# Altium PCB ScreenerPhotodiodeSense.PcbDoc
Units mm, origin at the board's own origin, x right, y up, seen from the top; angles counter-clockwise.
Board outline 54.9 x 37.97 mm, 2 copper layers (Top Layer, Bottom Layer); 24 components, 14 nets, 69 pads, 236 vias.
Unrouted connection lines stored in the file: 16.
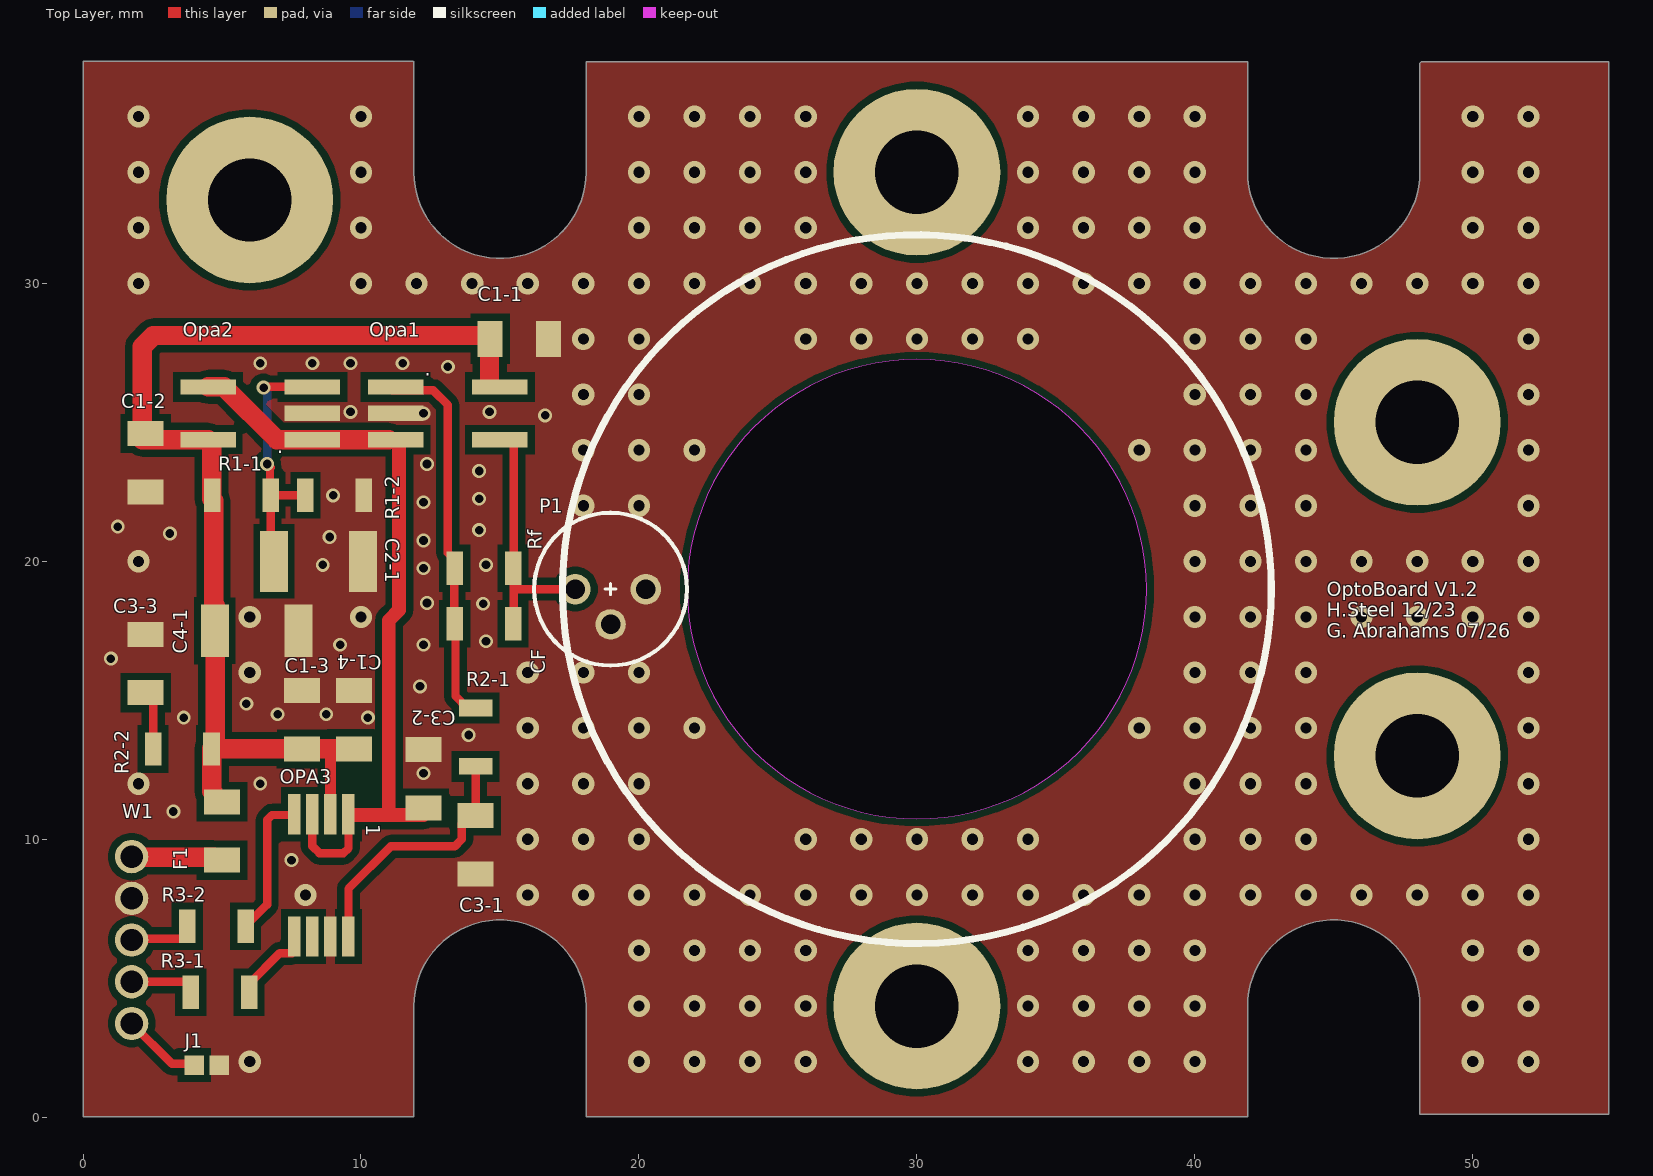
[diagram p0: Top Layer view]
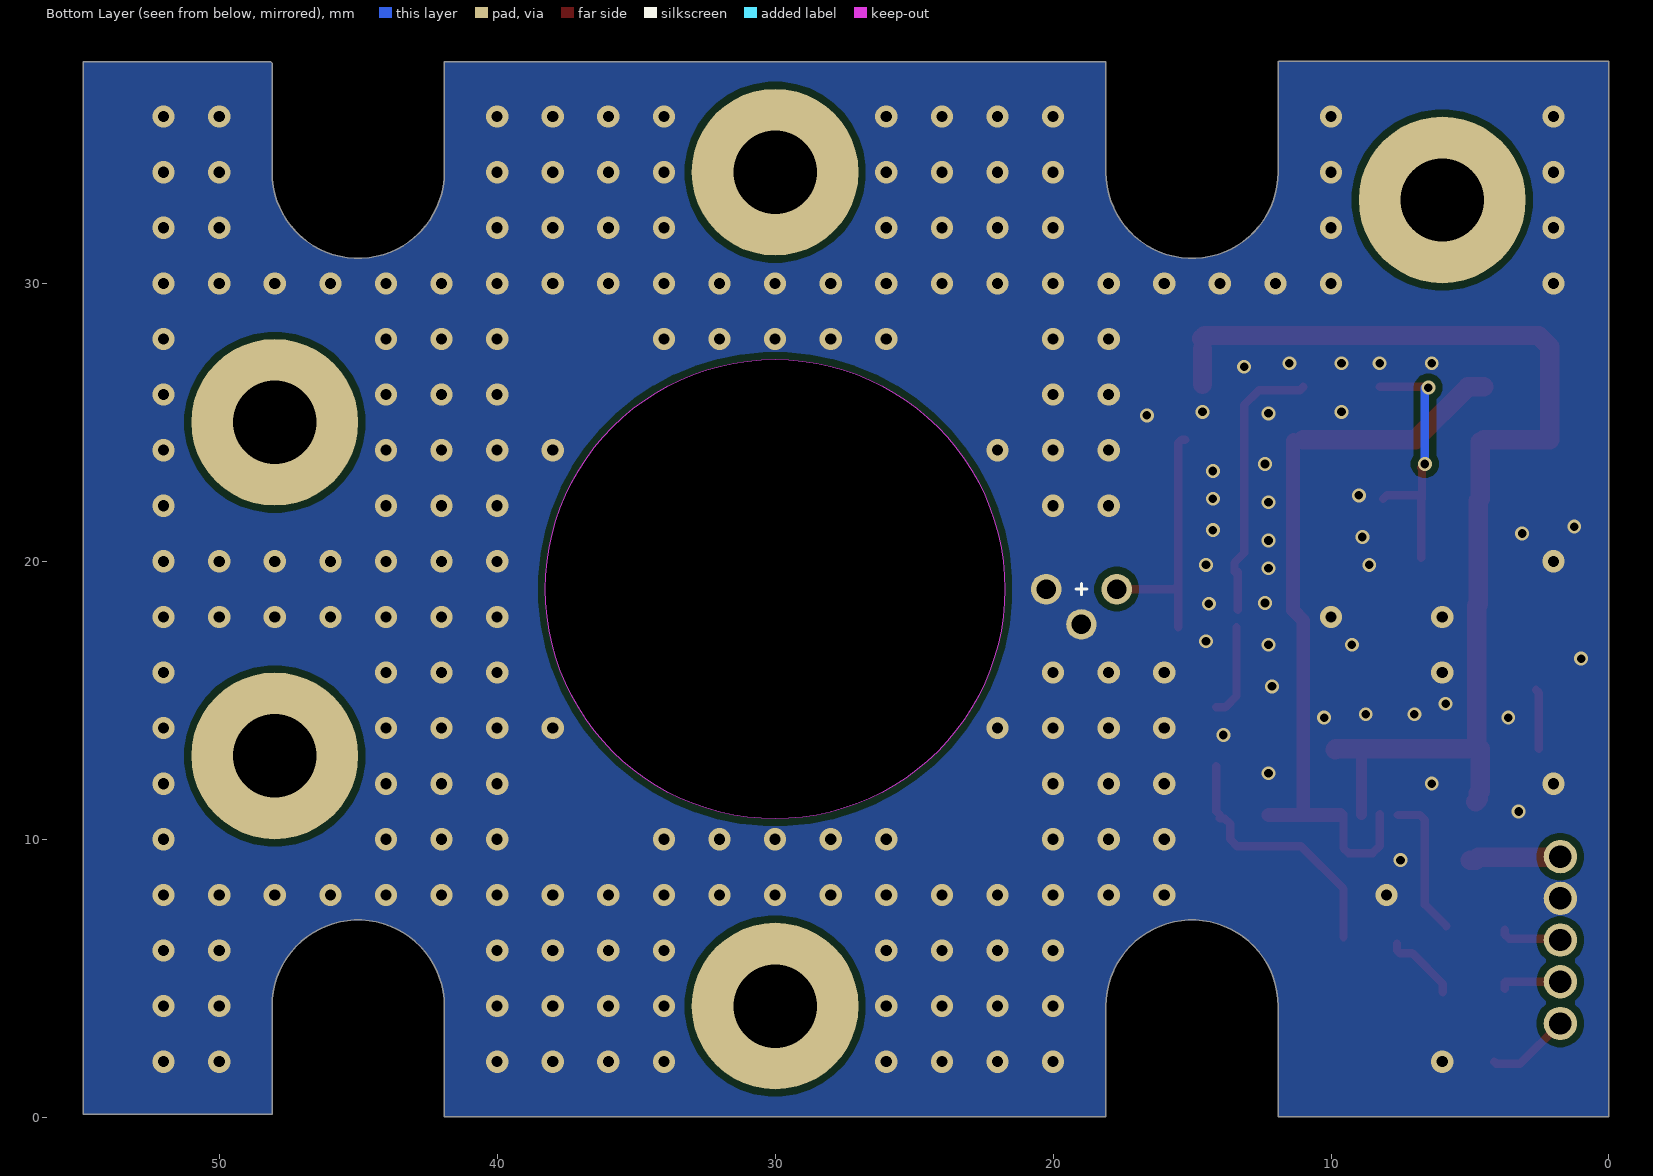
[diagram p1: Bottom Layer view, seen from below]

## Layer stack, top to bottom
Top Solder: solder mask 0.0102, Solder Resist, Dk 3.5
Top Layer: signal copper 0.0356
Dielectric 1: dielectric 0.32, FR-4, Dk 4.8
Bottom Layer: signal copper 0.0356
Bottom Solder: solder mask 0.0102, Solder Resist, Dk 3.5

## Board outline
0,0.025 11.9,0.025 11.9,4 cw(c15,4) 18.1,4 18.1,0.025 41.9,0.025 41.9,4 cw(c45,4) 48.1,4 48.1,0.1 54.9,0.1 54.9,37.975 48.15,37.975 48.1,37.925 48.1,34 cw(c45,34) 41.9,34 41.9,37.975 18.1,37.975 18.1,34 cw(c15,34) 11.9,34 11.9,37.975 11.875,38 0,38
cut-out: 21.735,19 ccw(c30,19) 30,10.735 ccw(c30,19) 38.265,19 ccw(c30,19) 30,27.265 ccw(c30,19)

## Design rules (kind name [scope] priority, off if disabled: settings)
Clearance [All] p1: gap=0.25 ignorepadtopadclearanceinfootprint=TRUE except(0: Arc-Text Track-Text SMDPad-Text THPad-Text Via-Text Fill-Text Poly-Text Region-Text Text-Text Text-Hole; 0.2: SMDPad-SMDPad THPad-THPad)
HoleSize [All] p1: absolutevalues=TRUE maxlimit=99 minlimit=0.025 maxpercent=80.000 minpercent=20.000
MinimumSolderMaskSliver [All] p1: minsoldermaskwidth=0
PlaneConnect [All] p1: planeconnectstyle=Direct reliefexpansion=0.508 reliefentries=4 reliefconductorwidth=0.254 reliefairgap=0.254
PolygonConnect [All] p1: connectstyle=Direct reliefconductorwidth=0.5 reliefentries=4 polygonreliefangle="90 Angle" airgapwidth=0.254
RoutingVias [All] p1: holewidth=0.45 width=0.8 viastyle="Through Hole" minholewidth=0.3 minwidth=0.5 maxholewidth=2 maxwidth=10
SolderMaskExpansion [All] p1: expansion=0.102 istentingtop=FALSE
Width [All] p1: maxlimit=50 minlimit=0.254 preferedwidth=0.254 minimp=50.000000 maximp=50.000000 favimp=50.000000
27 further rules are at their usual default settings.

## Components (designator, comment, footprint, x,y, rotation, side; value= is the part's Value field where it differs from the comment)
C1-1 "0.1uF" 0805 14.65,28 r0 top
C1-2 "0.1uF" 0805 2.25,22.5 r90 top
C1-3 "0.1uF" 0805 7.875,13.25 r90 top
C1-4 "0.1uF" 0805 9.75,13.25 r90 top
C2-1 "0.1uF NP0" 1206_Wide 6.875,20 r0 top
C3-1 "NC" 0805 14.125,8.75 r90 top
C3-2 "NC" 0805 12.25,13.225 r270 top
C3-3 "NC" 0805 2.25,17.375 r270 top
C4-1 "NC" 1206 4.75,17.5 r0 top
CF "NC" 0805_Compact 15.475,17.75 r180 top
F1 "FerriteBead1" 0805 5,9.25 r90 top
J1 "Jumper2" Jumper2 4,1.875 r0 top
Opa1 "Amplifier_TIA" SOT23-5 11.25,26.275 r0 top
Opa2 "Amplifier_Precision2" SOT23-5 8.25,24.375 r180 top
OPA3 "AD8476" 8-MSOP 9.55,10.9 r270 top
P1 "PhotodiodeS5971" TO-18 18.98,19 r180 top
R1-1 "10k" 0805_Compact 6.75,22.375 r180 top
R1-2 "10k" 0805_Compact 10.1,22.375 r180 top
R2-1 "0" 0805_Compact 14.125,12.625 r90 top
R2-2 "0" 0805_Compact 4.625,13.25 r180 top
R3-1 "49.9" 0805_Compact 3.875,4.5 r0 top
R3-2 "49.9" 0805_Compact 3.75,6.875 r0 top
Rf "Various" 0805_Compact 15.475,19.75 r180 top
W1 "PhotodiodeWires" PhotodiodeWires 1.75,9.375 r0 top

## Footprints (in the part's own frame and the unit in brackets; to place one, negate y for a bottom-side part, rotate by r counter-clockwise, add the part's x,y. Pads: shape width x height; smd on the part's side, far side on the other; paste and mask are expansions set on the pad)
8-MSOP [mm]
  rect 1.45x0.45 smd: 1(0,0) 2(0,-0.65) 3(0,-1.3) 4(0,-1.95) 5(4.4,-1.95) 6(4.4,-1.3) 7(4.4,-0.65) 8(4.4,0)
0805 [mm]
  rect 0.9x1.3 smd: 1(2.1,0) 2(0,0)
0805_Compact [mm]
  rect 0.6x1.2 smd: 1(2.1,0) 2(0,0)
1206 [mm]
  rect 1x1.9 smd mask+0.05: 1(0,0) 2(3,0)
1206_Wide [mm]
  rect 1x2.2 smd mask+0.05: 1(0,0) 2(3.2,0)
Jumper2 [mm]
  rect 0.7x0.7 smd mask+0.05: 1(0,0) 2(0.9,0)
PhotodiodeWires [mm]
  round 1.2 hole 0.8 mask+0.05: 1(0,0) 2(0,-1.5) 3(0,-3) 4(0,-4.5) 5(0,-6)
SOT23-5 [mm]
  rect 2x0.55 smd mask+0.051: 1(0,0) 2(0,-0.95) 3(0,-1.9) 4(3.75,-1.9) 5(3.75,0)
TO-18 [mm]
  round 1.1 hole 0.7 mask+0.05: 1(1.27,0) 2(0,1.27) 3(-1.27,0)
  silkscreen extent -2.75,-2.75 2.75,2.75

## Part data
C1-1 C1-2 C1-3 C1-4 C3-3 C4-1 CF: library part Capacitor1
  C3-3 C4-1: Digikey P/N=490-14531-1-ND
  CF: Digikey P/N="311-4124-1-ND, 311-4134-1-ND, 311-4130-1-ND, 13-CC0805BRNPO9BN5R6CT-ND"
C2-1 C3-1 C3-2: library part "Cap 0805", "Capacitor"
  C2-1: Digikey P/N=445-6984-1-ND
R1-1 R1-2 R2-1 R2-2 R3-1 R3-2 Rf: library part Res1
  R1-1 R1-2 R2-1: Digikey P/N=TNPU10.0KBBCT-ND
  R2-2 R3-1 R3-2: Digikey P/N=738-RNCF0805TKY49R9CT-ND
  Rf: Digikey P/N="541-TNPU08052K49BZEN00CT-ND, 541-4671-1-ND, 2019-RN73R2ATTD6192B05CT-ND, 541-TNPU080547K5BZEN00CT-ND, 2019-RN73R2ATTD3242A05CT-ND, 2019-RN73R2ATTD2292B05CT-ND,  2019-RN73R2ATTD1562B05CT-ND, 541-TNPU080515K0BZEN00CT-ND, 541-TNPU08057K50BZEN00CT-ND, 541-4456-1-ND, 541-TNPU08055K10BZEN00CT-ND,  541-4454-1-ND"
F1: Digikey P/N=445-MPZ2012S331ATD25CT-ND
Opa1: Digikey P/N=296-OPA328DBVRCT-ND
Opa2: Digikey P/N=296-OPA388QDBVRQ1CT-ND
OPA3: Digikey P/N=505-AD8476BRMZ-ND
P1: Digikey P/N=124-7158

## Free pads (board coordinates)
  round 6 hole 3 unplated paste+0: 2(6,33) 2(30,4) 2(30,34) 2(48,13) 2(48,25)

## Via types
v1: diameter 0.8, hole 0.4, Top Layer to Bottom Layer, tented both sides, 195 vias
v2: diameter 0.5, hole 0.31, Top Layer to Bottom Layer, tented both sides, 41 vias

## Nets (pads, with @x,y where several pads share a name; then routed paths per layer and width w, separated by ;. In a path a pad name is that pad's centre, name@x,y a point inside that pad or via, vN(x,y) a via of type N, cw(c..) or ccw(c..) an arc to the next point about the centre after c; other vN are vias at no path point)
2V5: C3-2.1 Opa1.3 Opa2.1 Opa2.4 OPA3.1 OPA3.3 | length 27.4
  Top Layer w0.3: OPA3.3 8.25,9.75 8.5,9.5 9.374,9.5 9.55,9.676 OPA3.1
  Top Layer w0.5: OPA3.1@9.675,10.875 11,10.875 ; Opa1.3@11.35,24.375 11.375,24.35 11.375,18.25 11,17.875 11,10.875 ; C3-2.1@12.25,10.875 11,10.875
  Top Layer w0.7: Opa2.4 5.075,26.275 6.975,24.375 Opa1.3@11,24.375
5V: C1-1.2 C1-2.1 C1-3.2 C1-4.2 C4-1.1 F1.1 Opa1.5 Opa2.5 OPA3.2 R1-1.1 R2-2.2 | length 40.3
  Top Layer w0.4: OPA3.2 8.9,13.2 ; C1-4.2@9.85,13.225 C1-4.2@9.875,13.25
  Top Layer w0.7: C1-2.1@2.125,24.375 Opa2.5 4.575,24.3 4.625,24.3 4.625,22.25 4.7,22.175 4.7,18.45 4.75,18.4 4.75,13.25 C1-3.2 9.825,13.25 C1-4.2@9.85,13.225 ; C1-2.1@2.125,24.5 2.125,27.715 2.535,28.125 14.55,28.125 14.65,28.025 C1-1.2 ; R2-2.2 4.625,11.725 4.7,11.65 4.7,11.45 F1.1@4.8,11.35 ; Opa1.5@14.625,26.375 C1-1.2@14.625,27.643
GND: C1-1.1 C1-2.2 C1-3.1 C1-4.1 C2-1.2 C3-1.2 C3-2.2 C3-3.2 C4-1.2 J1.2 Opa1.2 Opa2.2 OPA3.7 P1.2 P1.3 R1-2.2 W1.2
  other v1: 6,2 20,2 22,2 24,2 26,2 34,2 36,2 38,2 40,2 50,2 52,2 20,4 22,4 24,4 26,4 34,4 36,4 38,4 40,4 50,4 52,4 20,6 22,6 24,6 26,6 34,6 36,6 38,6 40,6 50,6 52,6 8,8 16,8 18,8 20,8 22,8 24,8 26,8 28,8 30,8 32,8 34,8 36,8 38,8 40,8 42,8 44,8 46,8 48,8 50,8 52,8 16,10 18,10 20,10 26,10 28,10 30,10 32,10 34,10 40,10 42,10 44,10 52,10 2,12 16,12 18,12 20,12 40,12 42,12 44,12 52,12 16,14 18,14 20,14 22,14 38,14 40,14 42,14 44,14 52,14 6,16 16,16 18,16 20,16 40,16 42,16 44,16 52,16 6,18 10,18 40,18 42,18 44,18 46,18 48,18 50,18 52,18 2,20 40,20 42,20 44,20 46,20 48,20 50,20 52,20 18,22 20,22 40,22 42,22 44,22 52,22 18,24 20,24 22,24 38,24 40,24 42,24 44,24 52,24 18,26 20,26 40,26 42,26 44,26 52,26 18,28 20,28 26,28 28,28 30,28 32,28 34,28 40,28 42,28 44,28 52,28 2,30 10,30 12,30 14,30 16,30 18,30 20,30 22,30 24,30 26,30 28,30 30,30 32,30 34,30 36,30 38,30 40,30 42,30 44,30 46,30 48,30 50,30 52,30 2,32 10,32 20,32 22,32 24,32 26,32 34,32 36,32 38,32 40,32 50,32 52,32 2,34 10,34 20,34 22,34 24,34 26,34 34,34 36,34 38,34 40,34 50,34 52,34 2,36 10,36 20,36 22,36 24,36 26,36 34,36 36,36 38,36 40,36 50,36 52,36
  other v2: 7.5,9.25 3.25,11 6.375,12 12.25,12.375 13.875,13.75 3.625,14.375 10.25,14.375 7,14.5 8.75,14.5 5.875,14.875 12.125,15.5 1,16.5 9.25,17 12.25,17 14.5,17.125 14.395,18.475 12.375,18.5 12.25,19.75 8.625,19.875 14.5,19.875 12.25,20.75 8.875,20.875 3.125,21 14.25,21.125 1.25,21.25 12.25,22.125 14.25,22.25 9,22.375 14.25,23.25 12.375,23.5 16.625,25.25 12.25,25.325 9.625,25.375 14.625,25.375 13.125,27 6.375,27.125 8.25,27.125 9.625,27.125 11.5,27.125
NetC2-1_1: C2-1.1 Opa2.3 R1-1.2 R1-2.1 | length 9.3
  Top Layer w0.3: v2(6.5,26.25) 6.525,26.275 Opa2.3 ; R1-1.2@6.725,22.25 6.725,23.35 v2@6.75,23.375 ; C2-1.1@6.75,20.125 R1-1.2 R1-2.1 R1-2.1@8.125,22.25
  Bottom Layer w0.3: v2(6.625,23.5) v2@6.625,26.25
NetC3-1_1: C3-1.1 OPA3.8 R2-1.2 | length 9.4
  Top Layer w0.3: OPA3.8@9.55,6.475 9.55,8.223 11.077,9.75 13.375,9.75 13.625,10 13.625,10.55 13.825,10.75 C3-1.1@14,10.75 ; C3-1.1@14,10.875 14.125,11 R2-1.2
NetC3-3_1: C3-3.1 R2-2.1 | length 2.2
  Top Layer w0.3: R2-2.1 2.525,15.275 C3-3.1@2.625,15.375
NetCF_1: CF.1 Opa1.1 R2-1.1 Rf.1 | length 13.3
  Top Layer w0.3: Opa1.1@11,26.275 11.125,26.15 12.6,26.15 13.125,25.625 13.125,20.3 13.475,19.95 Rf.1@13.475,19.625 ; CF.1@13.35,18.25 Rf.1@13.35,19.625 ; CF.1@13.4,17.625 13.4,15.15 13.8,14.75 R2-1.1@14.125,14.75
NetCF_2: CF.2 Opa1.4 P1.1 Rf.2 | length 9.5
  Top Layer w0.3: Opa1.4@15.25,24.375 15.375,24.375 15.5,24.25 15.5,19.75 15.5,19.125 ; CF.2@15.5,17.625 15.5,19 15.5,19.125 ; P1.1@17.855,18.875 P1.1@17.875,18.875 ; P1.1@17.98,19 17.855,19 15.625,19 15.5,19.125
NetF1_2: F1.2 W1.1 | length 3.3
  Top Layer w0.7: W1.1 1.775,9.35 4.7,9.35 4.8,9.25 F1.2
NetJ1_1: J1.1 W1.5 | length 3
  Top Layer w0.3: W1.5 3.2,1.925 4.05,1.925 J1.1@4.125,2
NetOpa3_4: OPA3.4 R3-2.1 | length 5.2
  Top Layer w0.3: R3-2.1 6.625,7.65 6.625,10.699 6.801,10.875 OPA3.4@7.6,10.875
NetOpa3_5: OPA3.5 R3-1.1 | length 2.7
  Top Layer w0.3: R3-1.1 5.975,4.8 7.075,5.9 7.525,5.9 7.625,6 OPA3.5@7.625,6.25
V1: R3-2.2 W1.3 | length 2.3
  Top Layer w0.3: W1.3 1.8,6.425 3.6,6.425 3.75,6.575 R3-2.2@3.75,6.75
V2: R3-1.2 W1.4 | length 2.2
  Top Layer w0.3: W1.4 3.725,4.875 3.75,4.85 R3-1.2@3.75,4.625
pads on no net: OPA3.6

## Polygon pours and split planes (outlines as drawn)
GND on Bottom Layer "NONET_L-01_P-001" (solid, remove dead copper, pour order 3): 11.9,0.025 11.9,4 cw(c15,4) 18.1,4 18.1,0.025 41.9,0.025 41.9,4 cw(c45,4) 48.1,4 48.1,0.1 54.9,0.1 54.9,37.975 48.15,37.975 48.1,37.925 48.1,34 cw(c45,34) 41.9,34 41.9,37.975 18.1,37.975 18.1,34 cw(c15,34) 11.9,34 11.9,37.975 11.875,38 0,38 0,0.025
GND on Top Layer "NONET_L-01_P-001" (solid, remove dead copper, pour order 2): 11.9,0.025 11.9,4 cw(c15,4) 18.1,4 18.1,0.025 41.9,0.025 41.9,4 cw(c45,4) 48.1,4 48.1,0.1 54.9,0.1 54.9,37.975 48.15,37.975 48.1,37.925 48.1,34 cw(c45,34) 41.9,34 41.9,37.975 18.1,37.975 18.1,34 cw(c15,34) 11.9,34 11.9,37.975 11.875,38 0,38 0,0.025

## Silkscreen, mask and mechanical layers (free items; w line width, h text height)
Top Overlay:
  circle w0.254: c30,19 r12.75
  text "OptoBoard V1.2 / H.Steel 12/23 / G. Abrahams 07/26" at 44.75,17.25 h0.5
Mechanical 1:
  circle w0.5: c30,19 r8.265
  lines w0.5: 0,0.025 0,38 11.875,38 11.9,37.975 11.9,34 ccw(c15,34) 18.1,34 18.1,37.975 41.9,37.975 41.9,34 ccw(c45,34) 48.1,34 48.1,37.925 48.15,37.975 54.9,37.975 54.9,0.1 48.1,0.1 48.1,4 ccw(c45,4) 41.9,4 41.9,0.025 18.1,0.025 18.1,4 ccw(c15,4) 11.9,4 11.9,0.025 0,0.025

## Text inside footprints (layer, text, board x,y; h text height)
OPA3: Top Overlay "1" at 10.192,10.546 h0.5 r270